# Altium PCB ProPrj_Project Ignis_2026-06-03.PcbDoc (part 2 of 2)
Units mm, origin at the board's own origin, x right, y up, seen from the top; angles counter-clockwise.
Board outline 123.2 x 67.87 mm, 18 copper layers (F.Cu, F.Mask, B.Cu, B.Mask, F.SilkS, B.SilkS, F.Adhes, B.Adhes, F.Paste, B.Paste, Dwgs.User, Cmts.User, Eco1.User, Eco2.User, Edge.Cuts, Margin, B.CrtYd, F.CrtYd); 71 components, 0 nets, 328 pads, 147 vias.
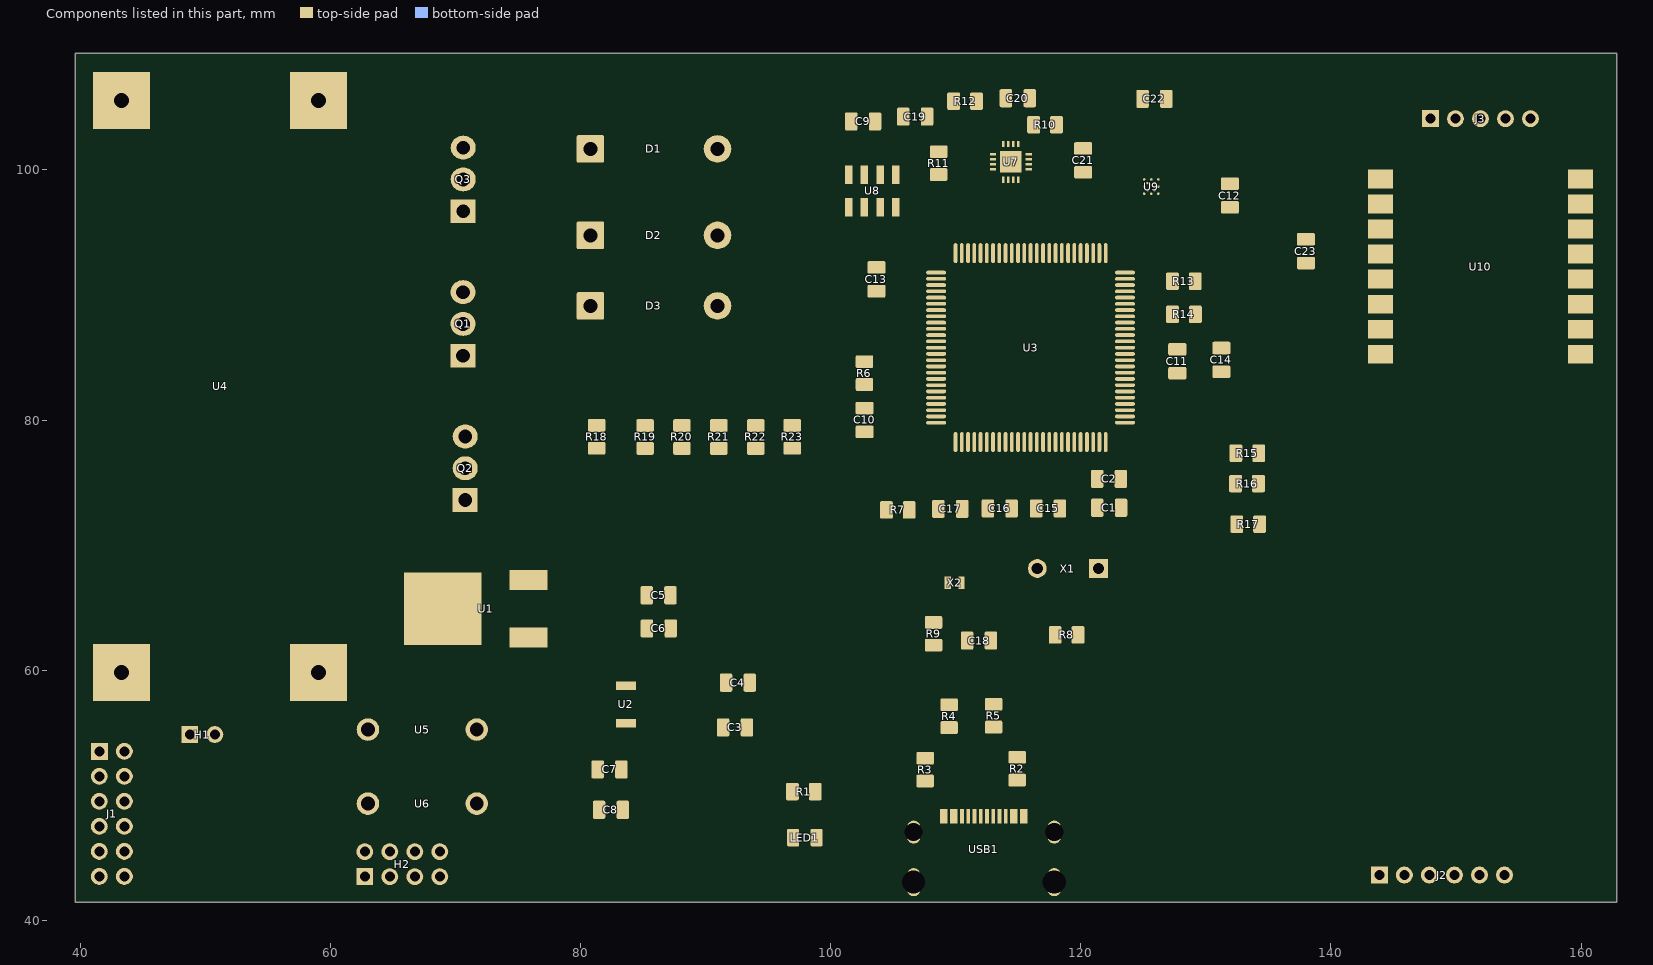
[diagram p8: the components of this part, seen from the top]

## Part data
C1 C2 C3 C4 C5 C6 C7 C8 C9 C10 C11 C12 C13 C14 C15 C16 C17 C18 C19 C20 C21 C22 C23: library part C_0805_2012Metric, "Capacitor SMD 0805 (2012 Metric), square (rectangular) end terminal, IPC-7351 nominal, (Body size source: IPC-SM-782 page 76, https://www.pcb-3d.com/wordpress/wp-content/uploads/ipc-sm-782a_amendment_1_and_2.pdf, https://docs.google.com/spreadsheets/d/1BsfQQcO9C6DZCsRaXUlFlo91Tg2WpOkGARC1WS5S8t0/edit?usp=sharing)", KiLib_Generator=SMD_2terminal_chip_molded
D1 D2 D3: library part D_DO-41_SOD81_P10.16mm_Horizontal, "Diode, DO-41_SOD81 series, Axial, Horizontal, pin pitch=10.16mm, length*diameter=5.2*2.7mm^2, https://www.diodes.com/assets/Package-Files/DO-41-Plastic.pdf", Datasheet=http://www.vishay.com/docs/88503/1n4001.pdf, Description="1000V 1A General Purpose Rectifier Diode, DO-41", KiLib_Generator=diode/THT, Sim.Device=D, Sim.Pins="1=K 2=A", ki_fp_filters=D*DO?41*
H1: library part PinHeader_1x02_P2.00mm_Vertical, "Through hole straight pin header, 1x02, 2.00mm pitch, single row", Manufacturer Part=PZ254V-11-02P, Manufacturer=XFCN(兴飞), LCSC Part Name="1x2P 间距:2.54mm 方针 直插", Datasheet=https://item.szlcsc.com/datasheet/PZ254V-11-02P/502957.html, Description="Pin Structure:1x2P Pitch:2.54mm Row Spacing:- Circluar Pins/Square Pins:Pin Header Mounting Type:Through Hole Number of Rows:1 Number of Pins:2P Current Rating:3A Voltage Rating (Max):250V Length of Mating Pin:6mm Insulation Height:2.5mm Length of End Con", KiLib_Generator=connector/pin_header_socket, Supplier Part=C492401, Supplier=LCSC
H2: library part PinHeader_2x04_P2.00mm_Vertical, "Through hole straight pin header, 2x04, 2.00mm pitch, double rows", Manufacturer Part=PZ254V-12-8P, Manufacturer=XFCN(兴飞), LCSC Part Name="2x4P 间距:2.54mm 方针 直插", Datasheet=https://item.szlcsc.com/datasheet/PZ254V-12-8P/502977.html, Description="Pin Structure:2x4P Pitch:2.54mm Row Spacing:2.54mm Circluar Pins/Square Pins:Pin Header Mounting Type:Through Hole Number of Rows:2 Number of Pins:8P Current Rating:- Voltage Rating (Max):- Length of Mating Pin:6mm Insulation Height:2.5mm Length of End Co", KiLib_Generator=connector/pin_header_socket, Supplier Part=C492421, Supplier=LCSC
J1: library part PinHeader_2x06_P2.00mm_Vertical, "Through hole straight pin header, 2x06, 2.00mm pitch, double rows", Description="Generic connector, double row, 02x06, top/bottom pin numbering scheme (row 1: 1...pins_per_row, row2: pins_per_row+1 ... num_pins), script generated (kicad-library-utils/schlib/autogen/connector/)", KiLib_Generator=connector/pin_header_socket, ki_fp_filters=Connector*:*_2x??_*
J2: library part PinHeader_1x06_P2.00mm_Vertical, "Through hole straight pin header, 1x06, 2.00mm pitch, single row", Description="Generic connector, single row, 01x06, script generated", KiLib_Generator=connector/pin_header_socket, ki_fp_filters=Connector*:*_1x??_*
J3: library part PinHeader_1x05_P2.00mm_Vertical, "Through hole straight pin header, 1x05, 2.00mm pitch, single row", Description="Generic connector, single row, 01x05, script generated", KiLib_Generator=connector/pin_header_socket, ki_fp_filters=Connector*:*_1x??_*
LED1: library part LED_0805_2012Metric, "LED SMD 0805 (2012 Metric), square (rectangular) end terminal, IPC-7351 nominal, (Body size source: https://docs.google.com/spreadsheets/d/1BsfQQcO9C6DZCsRaXUlFlo91Tg2WpOkGARC1WS5S8t0/edit?usp=sharing)", KiLib_Generator=SMD_2terminal_chip_molded
Q1 Q2 Q3: library part TO-220-3_Vertical, "TO-220-3, Vertical, RM 2.54mm, see https://www.vishay.com/docs/66542/to-220-1.pdf", Datasheet=http://www.irf.com/product-info/datasheets/data/irlz44n.pdf, Description="47A Id, 55V Vds, 22mOhm Rds Single N-Channel HEXFET Power MOSFET, TO-220AB", KiLib_Generator=package/TO_SOT/THT, ki_fp_filters=TO?220*
R1 R2 R3 R4 R5 R6 R7 R8 R9 R10 R11 R12 R13 R14 R15 R16 R17 R18 R19 R20 R21 R22 R23: library part R_0805_2012Metric, "Resistor SMD 0805 (2012 Metric), square (rectangular) end terminal, IPC-7351 nominal, (Body size source: IPC-SM-782 page 72, https://www.pcb-3d.com/wordpress/wp-content/uploads/ipc-sm-782a_amendment_1_and_2.pdf)", KiLib_Generator=SMD_2terminal_chip_molded
  R18 R19 R20 R21 R22 R23: Description=Resistor
U1: library part TO-252-2_L6.6-W5.6-P2.3-LS9.7, JLC_3DModel_Q=eec660cf81bf4a74bb3c7ab29ad977d9, JLC_3D_Size="6.6 9.7", Manufacturer Part=AMS1117-3.3, Manufacturer=YONGYUTAI(永裕泰), Datasheet=https://item.szlcsc.com/datasheet/AMS1117-3.3/43231650.html, Description="Output Type:Fixed Voltage - Supply:15V Output Voltage:3.3V Output Voltage:3.3V Output Current:800mA Power Supply Rejection Ratio (PSRR):75dB@(120Hz) Voltage Dropout:1.25V@(1A) standby current:- Noise:0.003%Vout Features:Over Current Protection；Over Temper", Supplier Part=C41414107, Supplier=LCSC, LCSC Part Name=AMS1117-3.3
U2: library part SOT-89-3_L4.5-W2.4-P1.50-LS4.0-BR, JLC_3DModel_Q=3e173860bf1340a4970e0d4da7c38a29, JLC_3D_Size="4.5 4.1", Manufacturer Part=AMS1117-5.0, Manufacturer=KUU, Datasheet=https://item.szlcsc.com/datasheet/AMS1117-5.0/44309945.html, Description="Output Type:Fixed Voltage - Supply:12V Output Voltage:5V Output Voltage:5V Output Current:800mA Power Supply Rejection Ratio (PSRR):- Voltage Dropout:1.3V@(0.8A) standby current:2mA Noise:0.003%Vout Features:Thermal Shutdown Operating Temperature:-40°C~+85", Supplier Part=C42387175, Supplier=LCSC, LCSC Part Name=AMS1117-5.0
U3: library part LQFP-100_L14.0-W14.0-P0.50-LS16.0-BL, JLC_3DModel_Q=dcc1c7ac602c4975b215b1407bde4684, JLC_3D_Size="16 16", Manufacturer Part=STM32G473VET6, Manufacturer=ST(意法半导体), LCSC Part Name="带DSP和FPU的170MHz主流ARM Cortex-M4 MCU，具有512 KB Flash存储器、数学加速器和高模拟电平集成", Datasheet=https://item.szlcsc.com/datasheet/STM32G473VET6/778077.html, Description="CPU Core:ARM-M4 CPU Maximum Speed:170MHz Program Storage Size:512KB Program Memory Type:FLASH Number of I/O:86 ADC (Bit):12bit DAC (Bit):12bit Voltage - Supply:1.71V~3.6V Voltage - Supply:1.71V~3.6V Applications:-", Supplier Part=C730122, Supplier=LCSC
U4: library part DC_DC_LM2596_small
U5 U6: library part DO-41_BD2.4-L4.7-P8.70-D0.8-FD, JLC_3DModel_Q=39d8e4572d564e62a86d2224fc908dd8, JLC_3D_Size="9.5 2.3985", Manufacturer Part=IN5819, Supplier Part=C9900005587, Supplier=LCSC, LCSC Part Name=IN5819
U7: library part QFN-24_L3.0-W3.0-P0.40-BL-EP, JLC_3DModel_Q=45d28e8706e7498c95f25f3d412d7c49, JLC_3D_Size="3 3", Manufacturer Part=MPU-6500, Manufacturer="TDK InvenSense(应美盛)", Datasheet=https://item.szlcsc.com/datasheet/MPU-6500/51287.html, Description="Accelerometer Sensing Axis:X,Y,Z Acceleration Measurement Range (MAX):±16g Acceleration Measurement Range (MAX):±16g Gyroscope Sensing Axis:X,Y,Z Gyroscope Measurement Range (MAX):±2000dps Gyroscope Measurement Range (MAX):±2000dps Sensor Type:IMU (accele", Supplier Part=C50278, Supplier=LCSC, LCSC Part Name=MPU-6500
U8: library part SENSORS-SMD_MS5611-01BA03, JLC_3DModel_Q=672fc546baaf493a9f668044721589aa, JLC_3D_Size="5 3", Manufacturer Part=MS561101BA03-50, Manufacturer="TE Connectivity(泰科电子)", LCSC Part Name=气压传感器，带不锈钢帽, Datasheet=https://item.szlcsc.com/datasheet/MS561101BA03-50/16320.html, Description="Pressure range:1Kpa~1.2bar Pressure range:1Kpa~1.2bar Voltage - Supply:1.8V~3.6V Voltage - Supply:1.8V~3.6V Standby Current:140nA Interface:SPI；I2C Module:Yes Absolute Accuracy:150pa Relative Accuracy:- Features:On-chip temperature output；Standby mode；Int", Supplier Part=C15639, Supplier=LCSC
U9: library part WLCSP-12_L1.6-W1.6_BMM150, JLC_3DModel_Q=e29c6614a3ad4a06ae6fc9d5a7a1f09f, JLC_3D_Size="1.56 1.56", Manufacturer Part=BMM150, Manufacturer=Bosch(博世), LCSC Part Name="三轴地磁式传感器 停产", Datasheet=https://item.szlcsc.com/datasheet/BMM150/183067.html, Description="Magnetic Sensing Range(X,Y):±1.3mT Magnetic Sensing Range(X,Y):±1.3mT Magnetic Sensing Range(Z):±2.5mT Magnetic Sensing Range(Z):±2.5mT Output bit:- Interface Type:SPI；I2C Voltage - Supply:1.62V~3.6V Voltage - Supply:1.62V~3.6V Current - Supply:- Operatin", Supplier Part=C171681, Supplier=LCSC
U10: library part Ai-Thinker-Ra-01-LoRa, "Ai Thinker Ra-01 LoRa", Datasheet=http://wiki.ai-thinker.com/_media/lora/docs/c048ps01a1_ra-02_product_specification_v1.1.pdf, Description="Ai-Thinker Ra-02 410-525 MHz LoRa Module, SPI interface, U.FL antenna connector", ki_fp_filters=Ai?Thinker?Ra?01*
USB1: library part TE_2340901-1, Manufacturer Part=USBC1-AF-046, Manufacturer=CHIN-BAN(勤本), LCSC Part Name="Type-C 母 沉板", Datasheet=https://item.szlcsc.com/datasheet/USBC1-AF-046/52896317.html, Description="Connector Type:Type-C Protocol Standard:USB 3.1 Gender:Female Mounting Type:Recessed Mount Number of Contacts:16P Number of Ports:1 Current Rating-Power:5A Connect-Disconnect Life:10,000 Cycles Length:6.5mm Detection color:Black Operating Temperature:-30°C", Supplier Part=C50305660, Supplier=LCSC
X1: library part HC-49US_L11.5-W4.5-P4.88, JLC_3DModel_Q=a8e34f6c394c4d60ace7720f62d1ccdf, JLC_3D_Size="10.9855 4.501", Manufacturer Part=6BS08000F20UCG, Manufacturer=SJK(晶科鑫), LCSC Part Name="8MHz ±20ppm 20pF", Datasheet=https://atta.szlcsc.com/upload/public/pdf/source/20220727/A799E7302D7A178404B6CABC66F8558B.pdf, Description="Crystal Type: Frequency: Frequency Tolerance: Frequency Tolerance: Frequency Stability:±30ppm Frequency Stability:±30ppm Load Capacitance: Operating Temperature: Operating Temperature:", Supplier Part=C252288, Supplier=LCSC
X2: library part ABS0532768KHZ6T, "ABS05-32.768KHZ-6-T-2", Manufacturer Part=9H03200028, Manufacturer=TXC(台湾晶技), LCSC Part Name="32.768kHz ±20ppm 7pF", Datasheet=https://atta.szlcsc.com/upload/public/pdf/source/20200108/C409339_4C8718E4B1BEC1560F6B97CF419D35BF.pdf, Description="Crystal Type:SMD Crystal Resonator Frequency: Frequency Tolerance: Frequency Tolerance: Load Capacitance: Equivalent Series Resistance (ESR):90kΩ Operating Temperature: Operating Temperature:", Supplier Part=C409339, Supplier=LCSC

## Via types
v1: diameter 0.6, hole 0.3, F.Cu to B.Cu, tented both sides, 147 vias

## Nets (pads, with @x,y where several pads share a name; then routed paths per layer and width w, separated by ;. In a path a pad name is that pad's centre, name@x,y a point inside that pad or via, vN(x,y) a via of type N, cw(c..) or ccw(c..) an arc to the next point about the centre after c; other vN are vias at no path point)
pads on no net: C1.1 C1.2 C2.1 C2.2 C3.1 C3.2 C4.1 C4.2 C5.1 C5.2 C6.1 C6.2 C7.1 C7.2 C8.1 C8.2 C9.1 C9.2 C10.1 C10.2 C11.1 C11.2 C12.1 C12.2 C13.1 C13.2 C14.1 C14.2 C15.1 C15.2 C16.1 C16.2 C17.1 C17.2 C18.1 C18.2 C19.1 C19.2 C20.1 C20.2 C21.1 C21.2 C22.1 C22.2 C23.1 C23.2 D1.1 D1.2 D2.1 D2.2 D3.1 D3.2 H1.1 H1.2 H2.1 H2.2 H2.3 H2.4 H2.5 H2.6 H2.7 H2.8 J1.1 J1.2 J1.3 J1.4 J1.5 J1.6 J1.7 J1.8 J1.9 J1.10 J1.11 J1.12 J2.1 J2.2 J2.3 J2.4 J2.5 J2.6 J3.1 J3.2 J3.3 J3.4 J3.5 LED1.1 LED1.2 Q1.1 Q1.2 Q1.3 Q2.1 Q2.2 Q2.3 Q3.1 Q3.2 Q3.3 R1.1 R1.2 R2.1 R2.2 R3.1 R3.2 R4.1 R4.2 R5.1 R5.2 R6.1 R6.2 R7.1 R7.2 R8.1 R8.2 R9.1 R9.2 R10.1 R10.2 R11.1 R11.2 R12.1 R12.2 R13.1 R13.2 R14.1 R14.2 R15.1 R15.2 R16.1 R16.2 R17.1 R17.2 R18.1 R18.2 R19.1 R19.2 R20.1 R20.2 R21.1 R21.2 R22.1 R22.2 R23.1 R23.2 U1.1 U1.2 U1.3 U2.1 U2.3 U3.1 U3.2 U3.3 U3.4 U3.5 U3.6 U3.7 U3.8 U3.9 U3.10 U3.11 U3.12 U3.13 U3.14 U3.15 U3.16 U3.17 U3.18 U3.19 U3.20 U3.21 U3.22 U3.23 U3.24 U3.25 U3.26 U3.27 U3.28 U3.29 U3.30 U3.31 U3.32 U3.33 U3.34 U3.35 U3.36 U3.37 U3.38 U3.39 U3.40 U3.41 U3.42 U3.43 U3.44 U3.45 U3.46 U3.47 U3.48 U3.49 U3.50 U3.51 U3.52 U3.53 U3.54 U3.55 U3.56 U3.57 U3.58 U3.59 U3.60 U3.61 U3.62 U3.63 U3.64 U3.65 U3.66 U3.67 U3.68 U3.69 U3.70 U3.71 U3.72 U3.73 U3.74 U3.75 U3.76 U3.77 U3.78 U3.79 U3.80 U3.81 U3.82 U3.83 U3.84 U3.85 U3.86 U3.87 U3.88 U3.89 U3.90 U3.91 U3.92 U3.93 U3.94 U3.95 U3.96 U3.97 U3.98 U3.99 U3.100 U4.1 U4.2 U4.3 U4.4 U5.1 U5.2 U6.1 U6.2 U7.2 U7.3 U7.4 U7.5 U7.8 U7.9 U7.10 U7.11 U7.14 U7.15 U7.16 U7.17 U7.20 U7.21 U7.22 U7.23 U7.25 U8.1 U8.2 U8.3 U8.4 U8.5 U8.6 U8.7 U8.8 U9.A1 U9.A3 U9.A5 U9.B2 U9.B4 U9.C1 U9.C5 U9.D2 U9.D4 U9.E1 U9.E3 U9.E5 U10.1 U10.2 U10.3 U10.4 U10.5 U10.6 U10.7 U10.8 U10.9 U10.10 U10.11 U10.12 U10.13 U10.14 U10.15 U10.16 USB1.A1/B12 USB1.A4/B9 USB1.A5 USB1.A6 USB1.A7 USB1.A8 USB1.B1/A12 USB1.B4/AP USB1.B5 USB1.B6 USB1.B7 USB1.B8 USB1.SH1 USB1.SH2 USB1.SH3 USB1.SH4 X1.1 X1.2 X2.1 X2.2
copper on no net: | length 3153.2
  F.Cu w0.1: v1(108.473,102.867) 110.397,102.867 112.013,101.251 112.986,101.251 ; 108.641,101.457 111.383,101.457 111.989,100.851 112.986,100.851 ; v1(110.099,99.891) 110.26,100.051 112.986,100.051 ; v1(111.395,100.667) 111.611,100.451 112.986,100.451 ; 113.374,98.055 113.414,98.095 113.414,99.223 ; v1(113.574,76.301) 114.447,76.301 115.491,77.345 115.491,78.245 ; v1(114.484,64.051) 114.484,62.971 115.24,62.215 v1(116.879,62.215) ; 115.414,99.223 115.519,99.119 115.519,98.666 115.744,98.441 116.044,98.741 116.612,98.741 116.862,98.491 118.574,98.491 ; 115.842,99.651 116.329,99.651 v1(116.695,99.285) ; 115.842,100.051 116.353,100.051 116.569,99.835 117.23,99.835 118.574,98.491 ; 115.842,100.851 116.294,100.851 116.967,100.178 117.29,100.178 v1(117.489,100.377) ; 115.842,101.251 116.574,101.251 117.014,101.691 117.024,101.691 v1(117.085,101.629) ; 115.842,101.651 116.004,101.651 v1(116.674,102.321) ; v1(116.384,98.191) 118.148,98.191 v1(118.404,97.935) ; 120.191,99.815 118.867,98.491 118.574,98.491 ; v1(123.329,98.785) 123.443,98.672 125.072,98.672 ; v1(123.609,99.534) 123.609,99.526 123.604,99.521 123.984,98.941 125.355,98.955 ; 124.404,100.734 124.404,99.906 125.072,99.238 ; 125.638,98.106 125.713,98.031 126.129,98.031 126.204,98.106 126.284,98.186 126.284,98.201 ; 125.638,99.238 126.124,99.724 v1(126.124,100.134) ; 126.204,98.672 126.284,98.592 126.284,98.201 ; 126.204,99.238 127.571,99.238 127.904,99.571 ; v1(128.671,97.604) 128.074,98.201 126.284,98.201 ; v1(130.954,104.331) 131.884,105.261 154.794,105.261 155.954,104.101
  F.Cu w0.2: 41.544,43.521 40.567,44.498 40.567,48.544 41.544,49.521 ; 41.544,51.521 43.544,49.521 45.87,47.195 66.499,47.195 69.89,50.586 72.205,50.586 72.916,49.875 72.916,48.197 ; 43.316,59.831 45.904,59.831 48.491,57.243 65.441,57.243 v1(68.701,53.983) 69.979,55.261 71.714,55.261 ; 43.316,105.551 45.904,105.551 48.491,108.139 v1(69.277,108.139) ; 48.774,54.861 49.751,54.861 49.751,54.495 51.137,53.108 v1(63.683,53.108) ; v1(50.572,48.468) 51.185,47.856 v1(65.899,47.856) 69.03,50.987 81.381,50.987 ; v1(50.751,62.972) 51.284,62.439 v1(55.145,62.439) 57.627,64.921 69.004,64.921 69.004,68.123 73.696,72.815 104.461,72.815 104.555,72.909 104.555,75.94 103.272,77.223 103.272,78.513 103.272,77.639 103.207,77.574 v1(102.703,77.574) ; 50.774,54.861 52.233,56.32 v1(55.796,56.32) 55.894,56.418 v1(59.095,56.418) ; v1(51.391,45.555) 54.422,42.524 65.741,42.524 ; v1(55.325,77.32) 60.38,82.375 87.687,82.375 96.607,91.295 108.441,91.295 ; 59.064,105.551 99.9,105.551 ; 62.764,43.501 63.741,43.501 63.741,43.867 64.351,44.478 65.169,44.478 65.741,43.906 65.741,42.524 ; v1(68.414,89.937) 71.49,93.012 106.122,93.012 107.339,91.795 108.441,91.795 ; 68.764,45.501 70.22,45.501 72.916,48.197 ; v1(71.08,59.462) 71.763,58.779 83.644,58.779 ; 71.714,49.341 69.223,49.341 65.787,45.905 65.787,45.097 66.36,44.524 71.636,44.524 v1(74.684,47.572) 75.633,46.623 97.004,46.623 97.896,47.514 v1(97.896,48.692) ; v1(75.751,64.429) 84.434,64.429 85.301,63.562 ; 75.851,62.621 77.653,62.621 77.989,62.285 86.158,62.285 87.221,63.348 91.561,59.008 ; 75.852,67.221 75.894,67.179 v1(75.894,66.383) ; 84.951,50.408 83.391,48.848 82.359,47.817 77.963,47.817 77.582,48.197 72.916,48.197 ; 85.321,63.348 85.311,63.358 ; 85.321,63.348 85.311,63.358 ; v1(85.488,57.161) 85.37,57.278 80.931,57.278 81.381,56.828 81.381,52.078 81.381,50.987 ; 87.221,63.348 87.221,65.978 87.211,65.988 ; v1(88.592,66.138) 91.64,69.187 122.288,69.187 122.519,68.956 v1(148.838,68.956) ; 91.411,55.428 91.06,55.779 ; 91.641,59.008 91.561,59.008 ; 93.311,55.428 93.541,55.658 93.541,59.008 98.558,59.008 v1(102.703,63.154) ; v1(98.051,96.555) 99.279,95.326 v1(102.981,95.326) 106.867,95.326 v1(109.095,93.098) 109.095,92.952 109.804,92.243 109.991,92.243 109.991,93.345 ; 98.772,50.303 98.879,50.195 98.879,47.023 ; 98.879,46.623 98.879,46.823 ; v1(99.877,96.572) 100.476,95.973 101.461,95.973 101.461,97.025 101.461,99.625 101.461,101.914 102.414,102.867 102.584,102.867 ; v1(101.264,81.891) 101.74,81.891 103.001,80.63 103.056,80.63 ; v1(102.086,101.68) 102.086,98.72 102.73,98.076 103.961,98.076 ; v1(102.09,92.209) 102.094,92.205 103.671,92.205 ; 102.711,82.845 103.261,82.295 108.441,82.295 ; 102.721,80.965 103.056,80.63 ; 103.272,78.514 102.721,79.065 106.609,79.065 107.339,79.795 108.441,79.795 109.543,79.795 109.772,79.565 ; 103.554,103.881 103.554,103.291 103.978,102.867 106.441,102.867 ; 103.671,90.305 102.711,89.345 102.711,84.67 102.753,84.627 v1(105.829,84.627) ; 103.961,97.025 103.961,98.076 ; 103.961,99.625 105.33,99.625 ; v1(104.6,47.094) 100.03,42.524 65.741,42.524 ; 105.211,97.025 105.211,95.973 109.179,95.973 v1(109.803,96.597) ; 105.211,99.625 105.33,99.625 ; 105.814,104.261 105.194,104.881 105.194,105.551 ; 106.286,72.815 106.286,72.84 106.624,73.178 v1(106.624,74.401) 106.624,75.114 107.221,75.711 113.208,75.711 113.728,75.191 114.339,75.191 116.491,77.343 116.491,78.245 ; 107.564,51.147 109.499,49.213 111.014,49.213 111.014,48.336 ; 107.564,52.972 107.293,52.7 ; 107.714,104.261 107.714,103.626 v1(108.473,102.867) 106.441,102.867 ; 108.231,62.005 108.601,62.375 110.921,62.375 110.921,64.437 112.622,66.138 ; 108.231,63.83 108.768,64.366 108.768,66.98 109.469,66.98 111.052,68.563 v1(112.81,68.563) ; 108.441,80.295 103.391,80.295 103.056,80.63 ; 108.441,83.795 110.439,83.795 113.673,87.029 v1(117.394,87.029) ; 108.621,72.905 110.827,75.111 v1(112.959,75.111) ; 108.641,99.632 107.574,98.566 103.538,98.566 102.711,99.392 102.711,99.625 102.711,100.676 102.711,102.74 102.584,102.867 99.9,105.551 ; 109.477,55.415 110.488,56.426 110.488,57.737 109.926,58.299 v1(109.846,58.299) ; v1(109.835,98.481) 110.261,98.055 113.374,98.055 v1(114.351,98.055) ; 110.444,106.1 108.763,106.1 108.214,105.551 105.194,105.551 ; 110.491,93.345 110.491,94.446 110.936,94.892 122.771,94.892 123.795,93.868 123.795,93.385 ; 110.521,72.905 112.541,72.905 112.571,72.935 113.599,71.907 117.313,71.907 118.341,72.935 121.261,72.935 121.321,72.995 121.321,74.875 120.891,75.305 ; v1(110.795,104.427) 110.795,104.626 111.664,105.494 ; v1(110.857,91.386) 110.991,91.52 110.991,93.345 ; v1(110.866,55.324) 110.866,55.591 112.556,57.282 113.034,57.282 ; 111.079,66.98 111.78,66.98 112.622,66.138 ; 111.491,93.345 111.491,90.909 v1(111.82,90.58) ; 111.514,48.336 111.514,50.591 113.014,52.091 ; v1(111.744,55.591) 111.878,55.457 113.034,55.457 ; 111.991,93.345 111.991,92.243 114.548,92.243 v1(114.766,92.025) ; 112.014,48.336 112.514,48.336 v1(112.364,50.261) ; 112.491,78.245 112.491,79.346 109.991,79.346 109.772,79.565 ; 112.491,93.345 112.491,94.446 122.265,94.446 v1(122.839,93.872) ; v1(112.584,81.651) 114.557,83.624 v1(120.332,83.624) 121.003,84.295 123.541,84.295 ; 112.821,62.375 113.26,62.375 v1(114.818,60.817) ; 113.014,48.336 113.014,52.091 ; v1(113.435,54.043) 109.328,54.043 108.434,54.936 108.434,56.197 108.955,56.718 ; v1(113.472,52.321) 113.244,52.321 113.014,52.091 ; 113.491,78.245 113.491,80.244 114.136,80.889 v1(114.675,80.889) ; 113.991,78.245 113.991,79.781 v1(114.174,79.964) ; 114.014,48.336 114.014,50.086 114.914,50.986 114.914,51.217 ; 114.021,105.735 114.021,105.125 v1(115.491,103.655) 115.905,103.655 ; v1(114.07,58.916) 109.554,58.916 104.969,54.331 104.969,52.474 ; v1(114.454,66.138) 112.622,66.138 ; 114.471,72.935 114.471,74.218 v1(115.952,75.699) ; v1(115.199,79.843) 115.696,79.346 115.991,79.346 115.991,78.245 ; 115.491,93.345 115.491,92.243 116.939,90.795 123.541,90.795 124.973,90.795 v1(125.773,91.595) ; 115.991,93.345 115.991,92.552 117.061,91.481 v1(121.097,91.481) ; v1(116.112,74.703) 116.714,75.305 120.891,75.305 ; 116.234,103.61 116.189,103.655 115.905,103.655 ; 116.441,72.935 116.441,73.151 v1(117.391,74.101) v1@117.538,74.248 ; v1(116.879,62.215) 117.489,62.825 117.958,62.825 117.958,66.707 116.531,68.135 119.549,68.135 v1(119.986,68.572) ; 116.991,78.245 116.991,77.143 117.525,76.609 v1(121.011,76.609) ; v1(117.853,101.403) 117.973,101.283 117.973,100.83 118.199,100.603 118.414,100.603 119.525,101.715 120.191,101.715 ; v1(118.384,102.001) 118.967,102.001 119.034,102.068 119.034,102.201 ; v1(118.541,103.875) 118.323,103.875 118.091,103.643 ; v1(118.988,100.247) 118.894,100.34 118.894,100.503 119.156,100.765 121.855,100.765 122.517,101.426 127.753,101.426 128.18,101 148.853,101 151.954,104.101 ; 119.784,62.825 121.413,64.454 121.413,68.135 ; 120.191,99.815 120.353,99.815 v1(121.24,98.928) ; v1(120.261,98.005) 121.221,98.005 v1(122.241,99.025) ; v1(120.291,107.18) 121.787,105.685 124.941,105.685 ; v1(120.332,96.011) 120.332,97.335 ; v1(120.961,104.625) 121.209,104.625 v1@121.231,104.647 ; 120.991,78.245 120.991,79.346 118.838,81.499 114.101,81.499 113.624,81.022 112.358,81.022 111.982,81.397 ; 121.311,75.305 120.891,75.305 ; 121.491,78.245 121.491,77.143 122.034,76.6 ; v1(122.531,103.195) 120.392,103.195 v1(120.276,103.31) 119.763,103.31 119.034,102.581 119.034,102.201 ; 123.211,75.305 123.211,73.005 123.221,72.995 120.844,70.618 108.017,70.618 ; v1(123.282,76.609) 122.042,76.609 122.034,76.6 ; 123.541,79.795 124.643,79.795 124.643,79.705 131.52,72.828 134.694,72.828 134.926,72.596 150.957,72.596 v1(154.193,69.361) ; 123.541,80.295 124.967,80.295 v1(125.271,79.991) ; 123.541,80.795 125.321,80.795 131.191,74.925 132.381,74.925 ; 123.541,81.295 122.439,81.295 122.439,79.562 130.317,71.685 132.476,71.685 ; 123.541,82.795 142.779,82.795 v1(143.468,83.484) ; 123.541,83.295 124.643,83.295 124.643,83.368 126.041,84.766 v1(141.245,84.766) v1(141.245,88.829) 143.687,91.271 143.954,91.271 ; 123.541,85.295 124.643,85.295 124.643,85.045 ; 123.541,91.295 121.284,91.295 v1(121.097,91.481) ; v1(124.451,93.385) 123.795,93.385 ; v1(124.721,96.465) 123.899,96.465 v1(123.382,96.981) 123.382,98.106 ; v1(124.931,89.188) 125.2,89.457 127.83,89.457 128.154,89.133 128.154,87.776 127.721,87.343 127.721,85.655 ; v1(124.958,94.763) 126.102,93.62 139.811,93.62 142.211,96.019 v1(142.211,96.147) ; 125.355,98.389 125.072,98.106 123.382,98.106 ; v1(125.782,88.211) 126.026,88.455 127.339,88.455 ; v1(126.214,84.08) 127.396,84.08 127.721,83.755 127.831,83.865 131.241,83.865 ; v1(126.64,80.362) 130.697,76.306 133.177,76.306 134.226,77.355 135.155,78.284 v1(136.238,78.284) ; v1(126.741,100.805) v1@126.741,100.734 ; 126.841,105.685 126.841,104.647 ; 127.331,91.105 127.331,91.383 121.379,97.335 120.332,97.335 ; 129.156,91.105 129.156,88.462 129.164,88.455 ; v1(129.441,101.625) 129.441,103.113 ; 132.401,77.355 133.935,78.889 157.258,78.889 v1(157.486,78.66) ; 134.301,71.685 147.505,71.685 v1(150.066,69.123) ; v1(134.516,99.275) 132.292,99.275 131.921,98.905 128.57,98.905 127.904,99.571 v1@126.741,100.734 ; v1(134.748,85.765) 131.241,85.765 127.831,85.765 127.721,85.655 ; v1(135.094,73.322) 134.206,74.21 134.206,74.925 134.987,75.706 156.141,75.706 v1(161.384,80.948) ; v1(136.643,92.196) 137.001,92.555 138.001,92.555 139.406,92.555 142.122,95.271 143.954,95.271 ; v1(139.999,91.771) 141.499,93.271 143.954,93.271 ; v1(140.218,94.921) 139.751,94.455 138.001,94.455 133.288,94.455 v1(131.969,95.774) 131.921,95.822 131.921,97.005 132.187,97.271 143.954,97.271 143.954,99.271 159.954,99.271 ; 143.874,43.631 124.325,43.631 114.914,53.042 107.634,53.042 107.292,52.7 ; v1(145.24,84.242) 158.04,84.242 v1(158.119,84.32) 158.652,84.854 158.652,85.271 159.954,85.271 ; v1(147.029,45.777) 151.728,45.777 153.874,43.631 ; 149.954,104.101 148.966,103.113 129.441,103.113 ; v1(156.734,90.194) 156.734,95.353 158.652,97.271 159.954,97.271 ; v1(158.192,90.864) 158.599,91.271 159.954,91.271 ; 159.954,95.271 159.954,93.271 161.256,93.271 161.256,92.969 v1(161.889,92.336) ; 81.381,50.987 81.381,48.958 81.436,48.903 ; 81.436,48.903 81.491,48.848 81.436,48.903 ; 85.301,63.562 85.301,65.998 89.756,70.453 107.852,70.453 ; 85.301,63.562 85.301,63.368 85.311,63.358 ; 87.211,65.988 87.201,65.998 87.211,65.988 ; 91.06,55.779 83.644,55.779 83.644,52.441 83.281,52.078 84.951,50.409 85.057,50.303 96.947,50.303 ; 91.06,55.779 91.06,58.508 91.561,59.008 ; 96.947,50.303 97.047,50.403 ; 96.947,50.303 97.047,50.403 ; 97.047,50.403 99.118,52.474 104.969,52.474 ; 98.879,47.023 98.879,46.823 98.879,47.023 ; 99.9,105.551 105.194,105.551 ; 103.961,98.076 108.763,98.076 109.504,97.335 120.332,97.335 ; 104.969,52.474 105.336,52.107 106.699,52.107 107.292,52.7 ; 105.33,99.625 105.45,99.625 106.546,100.72 106.441,100.826 106.441,102.867 ; 107.852,70.453 108.017,70.618 ; 107.852,70.453 108.017,70.618 ; 108.955,56.718 109.477,57.24 108.956,56.718 ; 109.772,79.565 111.596,81.388 111.921,81.388 111.93,81.397 111.982,81.397 ; 109.867,105.523 110.444,106.1 111.165,106.821 114.835,106.821 115.921,105.735 117.009,104.647 v1@121.231,104.647 ; 109.867,105.523 109.838,105.495 109.867,105.523 ; 111.982,81.397 111.982,84.026 v1(112.584,84.627) 112.751,84.795 123.541,84.795 124.643,84.795 124.643,85.045 ; 115.905,103.655 116.52,103.655 117.974,102.201 119.034,102.201 ; 118.091,103.643 118.058,103.611 118.091,103.643 ; 120.891,75.305 121.809,76.222 121.809,76.375 122.034,76.6 ; v1(121.097,91.481) 121.892,91.481 123.795,93.385 ; v1@121.231,104.647 126.841,104.647 ; v1(122.241,99.025) 123.16,98.106 123.382,98.106 ; v1(122.241,99.025) 123.95,100.734 124.404,100.734 v1@126.741,100.734 ; 124.643,85.045 125.087,85.488 125.886,85.488 ; 125.886,85.488 126.053,85.655 ; 125.886,85.488 126.053,85.655 ; 126.053,85.655 127.721,85.655 ; 126.841,104.647 127.907,104.647 129.441,103.113
  B.Cu w0.1: v1(109.803,96.597) 111.819,96.597 114.052,98.831 115.144,98.831 115.734,98.241 115.734,97.861 116.054,97.861 v1(116.384,98.191) ; v1(113.574,76.301) 113.574,64.961 v1(114.484,64.051) ; v1(114.351,98.055) 114.845,97.561 116.532,97.561 117.304,98.333 117.304,98.676 v1(116.695,99.285) ; v1(116.674,102.321) 116.944,102.591 116.944,106.951 117.723,107.73 122.175,107.73 123.609,106.296 v1(123.609,99.534) ; v1(117.085,101.629) 117.085,101.776 117.991,102.682 117.991,104.102 118.313,104.425 118.769,104.425 119.671,103.522 119.671,97.548 119.764,97.455 ; v1(117.394,87.029) 117.394,89.205 123.824,95.635 125.508,95.635 125.508,101.99 124.531,102.967 124.531,103.422 125.44,104.331 v1(130.954,104.331) ; v1(117.489,100.377) 117.577,100.377 117.874,100.08 118.043,100.08 118.694,100.731 118.694,101.181 118.934,101.421 118.934,103.482 v1(118.541,103.875) ; v1(118.404,97.935) 118.404,97.805 118.754,97.455 119.764,97.455 ; v1(123.329,98.785) 121.999,97.455 119.764,97.455 ; v1(126.124,100.134) 129.358,100.134 129.441,100.051
  B.Cu w0.2: 41.544,43.521 41.544,42.741 v1(42.034,42.251) ; 41.544,49.521 41.771,49.521 ; 41.544,51.521 40.563,50.54 40.563,46.502 41.544,45.521 43.544,43.521 ; v1(42.854,46.591) 43.544,47.281 43.544,47.521 41.771,49.294 41.771,49.521 ; 43.544,53.521 42.544,52.521 42.544,50.294 41.771,49.521 ; v1(51.391,45.555) 51.391,50.289 v1(51.546,50.444) ; v1(55.145,62.439) 55.145,51.725 62.369,44.501 65.764,44.501 66.764,45.501 ; v1(55.325,77.32) 56.396,76.249 56.396,57.245 60.124,53.517 60.124,48.141 62.764,45.501 ; v1(55.408,80.378) 59.064,76.723 59.064,59.831 59.064,57.243 59.095,57.212 v1(59.095,56.418) ; 63.014,55.261 63.683,54.592 v1(63.683,53.108) ; 64.764,45.501 64.764,86.287 v1(68.414,89.937) ; v1(65.899,47.856) 67.764,45.991 67.764,44.501 66.764,43.501 ; 68.764,43.501 68.764,45.501 ; v1(69.277,108.139) 75.894,101.522 v1(75.894,66.383) 75.894,64.572 v1(75.751,64.429) 75.751,64.133 v1(71.08,59.462) 70.466,58.848 70.466,50.589 71.714,49.341 ; v1(85.488,57.161) 85.488,63.034 v1(88.592,66.138) ; v1(97.896,48.692) 97.896,53.305 v1(98.574,53.983) ; v1(99.877,96.572) 102.09,94.359 v1(102.09,92.209) 102.09,82.366 101.615,81.891 v1(101.264,81.891) ; v1(102.703,63.154) v1(102.703,77.574) 102.703,81.502 v1(105.829,84.627) 109.095,87.893 v1(109.095,93.098) 108.503,93.69 108.503,97.149 v1(109.835,98.481) 108.473,99.843 v1(108.473,102.867) ; v1(104.6,47.094) 104.6,51.755 v1(105.594,52.749) 105.594,73.532 106.463,74.401 v1(106.624,74.401) ; v1(109.152,95.404) 109.152,95.946 v1(109.803,96.597) ; v1(109.846,58.299) 109.846,90.375 v1(110.857,91.386) ; v1(110.099,99.891) 110.099,103.731 v1(110.795,104.427) ; v1(110.866,55.324) 111.554,54.636 111.554,51.071 v1(112.364,50.261) ; v1(111.395,100.667) 111.395,102.876 ; v1(111.744,55.591) 111.744,90.504 v1(111.82,90.58) ; v1(111.984,103.465) 111.395,102.876 ; v1(112.584,81.651) 112.337,81.404 112.337,69.993 v1(112.534,69.796) 112.209,69.47 112.209,61.592 v1(113.736,60.065) 113.736,59.25 v1(114.07,58.916) 114.818,59.664 v1(114.818,60.817) 115.41,61.409 115.41,74 v1(116.112,74.703) ; v1(112.81,68.563) 113.139,68.892 113.139,74.931 v1(112.959,75.111) 112.959,79.638 114.381,81.06 114.504,81.06 v1(114.675,80.889) ; v1(113.435,54.043) 113.472,54.005 v1(113.472,52.321) ; v1(114.174,79.964) 114.174,66.419 v1(114.454,66.138) ; v1(114.766,92.025) 117.14,94.4 117.14,96.757 117.804,97.421 117.804,98.184 118.225,98.604 118.988,98.604 v1(118.988,100.247) ; v1(115.199,79.843) 115.952,79.09 v1(115.952,75.699) 116.654,75.698 121.413,70.94 121.413,68.135 ; 116.531,68.135 117.391,68.995 v1(117.391,74.101) ; v1(117.853,101.403) 117.685,101.403 117.685,101.381 117.334,101.03 117.293,101.03 116.557,100.293 114.826,100.293 114.078,99.544 114.078,99.351 113.046,98.319 111.444,98.319 111.091,98.672 111.091,102.572 111.395,102.876 ; 118.754,97.455 118.754,94.15 116.791,92.187 116.791,86.293 120.104,82.98 126.011,82.98 126.845,83.814 126.845,87.148 v1(125.782,88.211) ; v1(120.261,98.005) 120.276,98.02 v1(120.276,103.31) 120.021,103.565 120.021,106.91 v1(120.291,107.18) ; v1(120.332,83.624) 121.989,83.624 124.329,85.964 ; v1(120.332,96.011) 121.438,96.011 123.974,98.547 123.974,99.169 v1(123.609,99.534) ; v1(120.961,104.625) 121.24,104.346 v1(121.24,98.928) ; v1(121.011,76.609) 123.391,78.989 v1(130.108,78.989) 132.789,76.308 132.789,74.74 ; v1(122.839,93.872) 124.067,93.872 v1(124.958,94.763) ; v1(124.931,89.188) 125.773,90.03 v1(125.773,91.595) ; v1(125.081,103.195) 126.741,101.535 v1(126.741,100.805) ; v1(125.271,79.991) 125.643,80.362 v1(126.64,80.362) ; v1(126.214,84.08) 124.329,85.964 ; v1(129.441,101.625) 129.441,100.051 129.441,98.302 ; v1(131.969,95.774) 129.441,98.302 ; v1(132.789,69.621) 132.789,74.74 ; v1(134.516,99.275) 136.643,97.148 v1(136.643,92.196) 136.643,87.66 v1(134.748,85.765) ; v1(135.094,73.322) 135.094,56.411 147.874,43.631 ; v1(139.999,91.771) 139.999,86.953 v1(143.468,83.484) ; v1(140.218,94.921) 140.218,92.944 v1(142.069,91.093) 142.069,87.413 v1(145.24,84.242) ; v1(145.24,90.194) 142.211,93.223 v1(142.211,96.147) 142.211,100.157 147.132,105.078 152.977,105.078 153.954,104.101 ; 145.874,43.631 146.493,43.631 147.47,42.654 148.279,42.654 148.851,43.226 148.851,69.698 ; v1(147.029,45.777) 147.029,63.051 v1(135.34,74.74) 132.789,74.74 ; 147.954,104.101 147.954,103.124 148.851,102.228 148.851,69.698 ; v1(148.838,68.956) 148.838,69.685 148.851,69.698 ; 149.874,43.631 149.874,68.93 v1(150.066,69.123) ; 151.874,43.631 157.486,49.243 v1(157.486,78.66) 157.486,90.158 v1(158.192,90.864) ; v1(154.193,69.361) 154.193,81.624 v1(155.984,83.415) 155.984,89.444 v1(156.734,90.194) ; v1(158.119,84.32) 158.119,77.771 v1(162.363,73.527) ; v1(161.384,80.948) 161.889,81.453 v1(161.889,92.336) ; 124.329,85.964 124.329,93.263 v1(124.451,93.385) v1(128.671,97.604) 129.368,98.302 129.441,98.302
  Edge.Cuts w0.254: 39.634,41.441 162.834,41.441 162.834,109.311 39.634,109.311 39.634,41.441

## Text inside footprints (layer, text, board x,y; h text height)
D1: F.Fab "K" at 80.677,103.501 h1; F.SilkS "K" at 80.677,103.501 h1
D2: F.Fab "K" at 80.677,96.591 h1; F.SilkS "K" at 80.677,96.591 h1
D3: F.Fab "K" at 80.677,90.951 h1; F.SilkS "K" at 80.677,90.951 h1
U4: F.SilkS "IN" at 51.605,60.028 h1.5 r90; F.SilkS "OUT" at 51.616,104.106 h1.5 r90
USB1: F.Fab "PCB EDGE" at 117.814,40.834 h0.8